# Altium PCB nrf_400708.PcbDoc (part 5 of 6)
Units mm, origin at the board's own origin, x right, y up, seen from the top; angles counter-clockwise.
Board outline 117 x 63.5 mm, 4 copper layers (Top Layer, Mid-Layer 1, Mid-Layer 2, Bottom Layer), stack 1.556 mm thick; 226 components, 168 nets, 912 pads, 2002 vias.
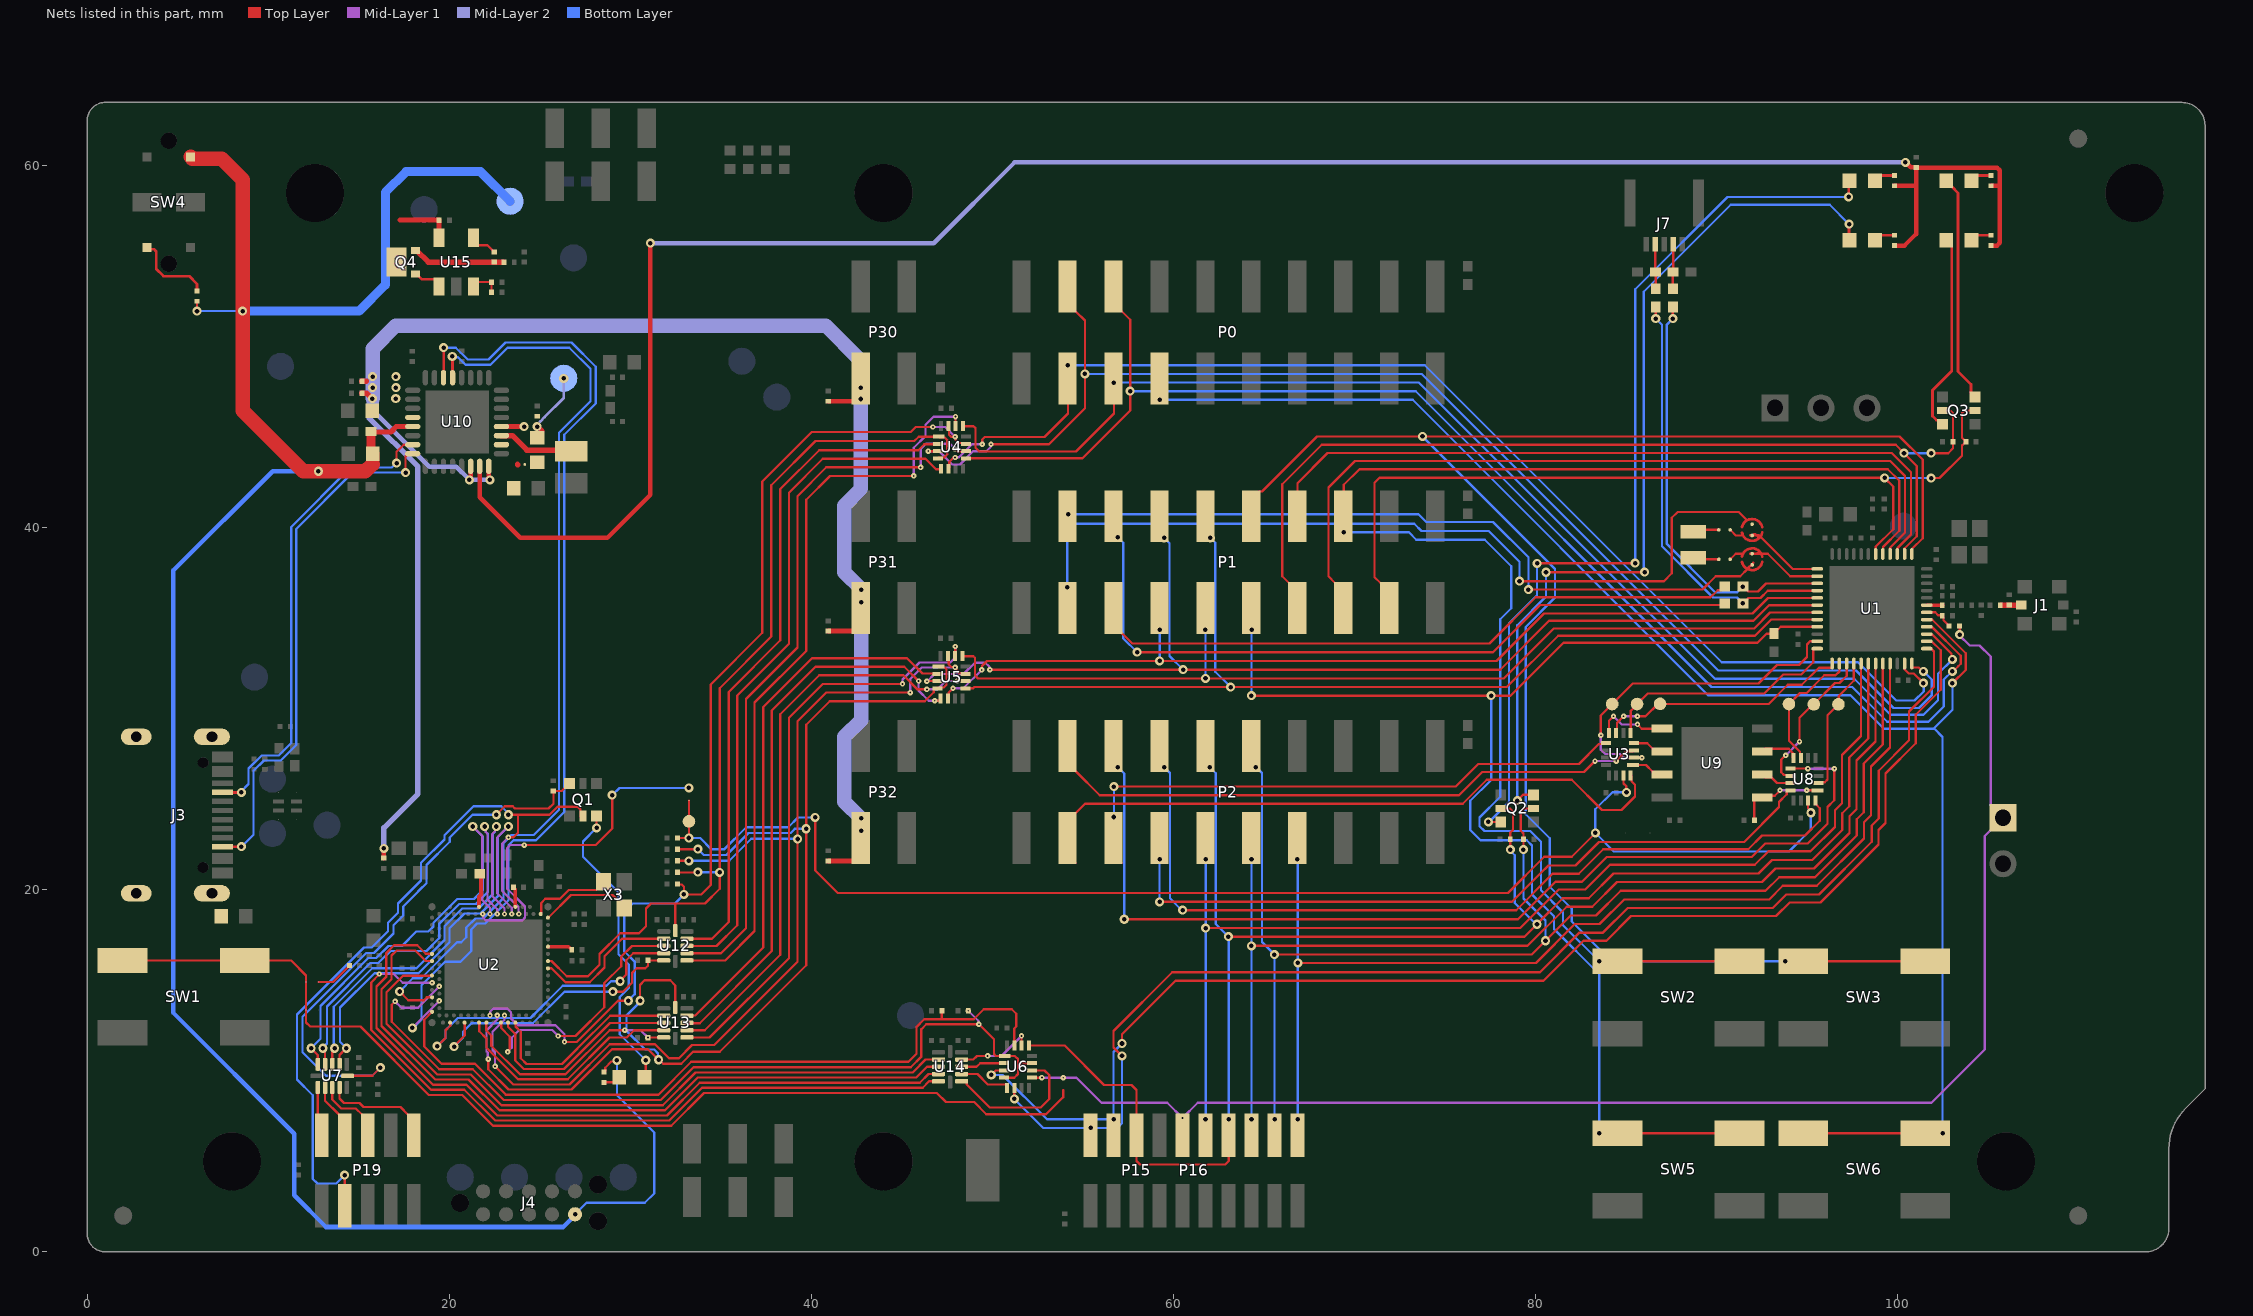
[diagram p5: the nets of this part, all layers, seen from the top]

## Via types
v1: diameter 0.5, hole 0.25, Top Layer to Bottom Layer, tented both sides, 1905 vias
v2: diameter 0.3, hole 0.1, Top Layer to Mid-Layer 1, tented top, 77 vias
v3: diameter 0.3, hole 0.1, Top Layer to Mid-Layer 1, tented both sides, 20 vias

## Nets (pads, with @x,y where several pads share a name; then routed paths per layer and width w, separated by ;. In a path a pad name is that pad's centre, name@x,y a point inside that pad or via, vN(x,y) a via of type N, cw(c..) or ccw(c..) an arc to the next point about the centre after c; other vN are vias at no path point) (continued)
NetC44_1: C44.1 U2.A23 | length 1.1
  Top Layer w0.2: C44.1@23.55,20.154 23.55,20.139 23.66,20.029 U2.A23@23.66,19.064
NetC45_2: C45.2 U2.A13 | length 1.9
  Top Layer w0.225: U2.A13@21.66,19.064 21.66,19.644 21.77,19.754 C45.2@21.77,20.891
NetC59_1: C59.1 J3.SHLD
NetC60_1: C60.1 R3.1 U1.30 | length 1.6
  Top Layer w0.125: U1.30@101.63,35.33 102.102,35.33 102.257,35.175 102.44,35.175 C60.1@102.49,35.125 ; C60.1@102.489,35.117 102.505,35.117 102.561,35.061 102.561,34.99 102.563,34.988 102.563,34.887 R3.1@102.87,34.58
NetC64_2: C64.2 R1.2 R2.2 R19.2 R20.2 U10.31 | length 114.9
  Top Layer w0.25: U10.31@21.692,43.396 21.692,41.686 23.928,39.45 28.749,39.45 31.125,41.826 v1(31.125,55.727) ; R1.2@99.848,55.594 100.403,55.594 101.039,56.23 101.039,58.896 ; R19.2@99.848,58.896 101.039,58.896 ; v1(100.445,60.185) 100.468,60.185 100.743,59.91 101.029,59.91 C64.2@101.039,59.9 ; R2.2@105.182,55.594 105.515,55.594 105.661,55.74 105.661,58.896 ; R20.2@105.182,58.896 105.661,58.896 ; 101.039,58.896 C64.2@101.039,59.9 ; C64.2@101.039,59.9 105.515,59.9 105.661,59.754 105.661,58.896
  Mid-Layer 2 w0.25: v1(31.125,55.727) 46.777,55.727 51.235,60.185 v1(100.445,60.185)
NetC72_1: C72.1 R43.2 U15.3 | length 1.7
  Top Layer w0.125: U15.3@21.35,53.325 21.35,53.338 21.587,53.575 C72.1@22.35,53.575 R43.2@22.35,53.025
NetJ3_A5: J3.A5 U10.23 | length 26.4
  Top Layer w0.125: v1(17.1,43.575) 17.097,43.578 17.097,44.197 17.493,44.593 17.989,44.593 U10.23@17.992,44.596
  Top Layer w0.15: J3.A5@7.485,25.384 v1@8.526,25.384
  Bottom Layer w0.125: v1(8.527,25.383) 8.527,25.451 8.92,25.844 8.92,26.699 9.648,27.428 10.586,27.428 11.275,28.116 11.275,40.046 14.556,43.327 16.839,43.327 17.087,43.575 v1(17.1,43.575)
NetJ3_B5: J3.B5 U10.24 | length 29.1
  Top Layer w0.125: v1(17.594,43.05) 17.591,43.053 17.591,43.935 17.752,44.096 U10.24@17.992,44.096
  Top Layer w0.15: J3.B5@7.485,22.384 v1(8.529,22.384)
  Bottom Layer w0.125: v1(8.529,22.384) 8.538,22.384 9.2,23.046 9.2,26.575 9.775,27.15 10.701,27.15 11.553,28.001 11.553,39.931 14.671,43.05 v1(17.594,43.05)
NetL2_1: L2.1 U1.31 | length 0.9
  Top Layer w0.2: U1.31@101.664,35.73 L2.1@102.521,35.73 ; L2.1@102.521,35.73 L2.1@102.522,35.729
NetL8_2: L8.2 U10.3 | length 4.2
  Top Layer w0.3: U10.3@22.892,45.096 23.492,45.096 24.292,44.296 L8.2@26.749,44.296
NetLD1_1: LD1.1 Q1.6 | length 16.6
  Top Layer w0.125: v1(28.15,23.425) Q1.6@28.15,24.082 ; LD1.1@30.865,9.716 v1(30.865,10.588)
  Top Layer w0.15: LD1.1@30.802,9.652 LD1.1@30.865,9.716
  Bottom Layer w0.125: v1(28.15,23.425) 27.4,22.675 27.4,21.825 29.358,19.867 29.358,16.442 29.925,15.875 29.925,14.575 29.425,14.075 29.425,12.029 v1(30.865,10.588)
NetLD1_2: LD1.2 R5.1 | length 1.4
  Top Layer w0.125: LD1.2@29.12,9.937 LD1.2@29.405,9.652
  Top Layer w0.15: R5.1@28.56,9.367 29.12,9.367 LD1.2@29.405,9.652
NetLD2_1: LD2.1 Q2.6 | length 51.5
  Top Layer w0.125: v1(77.411,23.75) Q2.6@78.1,23.75 ; v1(80.106,38.04) 80.11,38.044 85.519,38.044 v1(85.525,38.05)
  Top Layer w0.15: v1(97.316,58.277) 97.316,59.125 LD2.1@97.371,59.181
  Bottom Layer w0.125: v1(77.411,23.75) 77.45,23.75 78.55,24.85 78.55,34.725 80.106,36.281 v1(80.106,38.04) ; v1(85.525,38.05) 85.525,53.174 90.629,58.278 v1(97.316,58.277)
NetLD2_2: LD2.2 R19.1 | length 1.2
  Top Layer w0.15: LD2.2@98.768,59.181 99.053,59.466 R19.1@99.848,59.466
NetLD3_1: LD3.1 Q3.6 | length 12.6
  Top Layer w0.15: LD3.1@102.705,59.155 103.011,58.849 103.358,58.502 103.358,48.642 104.075,47.925 104.075,47.538 104.076,47.537 104.076,47.449 Q3.6@104.3,47.225
NetLD3_2: LD3.2 R20.1 | length 1.2
  Top Layer w0.15: LD3.2@104.102,59.181 104.387,59.466 R20.1@105.182,59.466
NetLD4_1: LD4.1 Q2.3 | length 49.9
  Top Layer w0.125: v1(79.016,24.934) 79.332,25.25 Q2.3@79.9,25.25 ; v1(80.598,37.544) 86.044,37.544 v1(86.05,37.55)
  Top Layer w0.15: v1(97.341,56.777) 97.341,55.909 LD4.1@97.371,55.879
  Bottom Layer w0.125: v1(79.016,24.934) 79.016,34.618 80.598,36.2 v1(80.598,37.544) ; v1(86.05,37.55) 85.991,37.609 85.991,53.041 90.8,57.85 96.268,57.85 v1(97.341,56.777)
NetLD4_2: LD4.2 R1.1 | length 0.8
  Top Layer w0.15: LD4.2@99.053,56.164 R1.1@99.848,56.164
NetLD5_1: LD5.1 Q3.3 | length 11
  Top Layer w0.15: Q3.3@102.5,45.725 102.275,45.95 102.168,45.95 101.95,46.168 101.95,47.6 103.013,48.663 103.013,55.459 103.011,55.461 103.011,55.573 LD5.1@102.705,55.879
NetLD5_2: LD5.2 R2.1 | length 0.8
  Top Layer w0.15: LD5.2@104.387,56.164 R2.1@105.182,56.164
NetP1_5: P1.5 R33.2 | length 36.7
  Top Layer w0.125: P1.5@56.729,35.877 56.729,34.607 57.734,33.603 77.469,33.603 80.032,36.165 89.69,36.165 90.082,36.557 90.275,36.557 R33.2@90.474,36.755
NetP1_6: P1.6 R34.2 | length 41.6
  Top Layer w0.125: P1.6@56.704,40.64 56.704,39.721 v1(56.95,39.475) ; v1(58.012,33.128) 77.666,33.128 80.268,35.73 90.374,35.73 R34.2@90.474,35.83
  Bottom Layer w0.125: v1(56.95,39.475) 57.25,39.175 57.25,33.89 v1(58.012,33.128)
NetQ1_3: Q1.3 R8.1 U7.12 | length 30.8
  Top Layer w0.125: U7.12@14.4,9.725 15.75,9.725 v1(16.2,10.175) ; v1(22.608,24.15) 23.071,24.613 23.517,24.613 23.641,24.488 25.491,24.488 25.766,24.763 R8.1@25.766,25.449 ; R8.1@25.76,25.455 26.223,25.455 26.477,25.71 Q1.3@26.651,25.71
  Bottom Layer w0.125: v1(16.2,10.175) 15.75,9.725 13.2,9.725 11.9,11.025 11.9,12.983 15.429,16.512 15.848,16.512 16.925,17.589 16.925,18.05 17.462,18.588 17.462,19.081 18.183,19.802 18.371,19.99 18.753,20.372 18.753,21.369 20.043,22.66 20.043,22.893 21.3,24.15 v1(22.608,24.15)
NetQ4_1: Q4.1 U15.1 | length 1.7
  Top Layer w0.15: Q4.1@18.15,54.025 18.2,54.025 18.5,53.725 19.225,53.725 19.45,53.5 U15.1@19.45,53.325
NetQ4_2: Q4.2 R9.1 R38.2 | length 5.1
  Top Layer w0.3: Q4.2@18.15,55.325 18.2,55.325 18.851,54.674 R9.1@23.006,54.674
NetR7_1: R7.1 U2.L31 | length 1.4
  Top Layer w0.187: U2.L31@25.46,16.864 26.597,16.864 26.719,16.743 26.734,16.743 26.775,16.702 R7.1@26.775,16.687
NetR23_1: R23.1 SB8.2 | length 2.1
  Top Layer w0.125: SB8.2@12.8,14.91 13.595,14.91 14.412,15.728 14.412,15.743 14.485,15.815 R23.1@14.5,15.815
NetR35_1: R35.1 SB11.2 TP7.1 U3.15 U8.15 | length 77.3
  Top Layer w0.125: R35.1@32.61,22.864 v1(33.25,22.864) TP7.1@33.25,23.783 SB11.2@33.25,24.933 ; v1(40.225,24) 40.225,21.075 41.478,19.822 78.497,19.822 80.5,21.825 82.025,21.825 83.325,23.125 v1(83.325,23.146) ; U3.15@84.875,26.325 84.875,25.882 85.024,25.733 85.024,25.406 v1(85.044,25.385) ; U8.15@95.075,24.925 95.075,24.506 95.225,24.356 v1(95.225,24.26)
  Bottom Layer w0.125: v1(33.25,22.864) 33.874,22.864 34.502,22.236 35.192,22.236 36.41,23.455 38.737,23.455 39.282,24 v1(40.225,24) ; v1@84.816,25.395 84.27,25.395 83.325,24.45 v1(83.325,23.146) 83.376,23.095 84.346,22.125 94.025,22.125 95.225,23.325 v1(95.225,24.26)
NetR36_1: R36.1 SW4.3 | length 4.5
  Top Layer w0.15: SW4.3@3.321,55.488 3.418,55.392 3.708,55.392 3.825,55.275 3.825,54.3 4.225,53.9 5.646,53.9 6.075,53.471 R36.1@6.075,53.085
NetR38_1: R38.1 U15.4 | length 1.6
  Top Layer w0.125: U15.4@21.35,56.025 21.35,55.825 21.572,55.603 22.126,55.603 R38.1@22.485,55.245
NetSB1_2: SB1.2 SB2.1 SB8.1 SW1.2 | length 59.2
  Top Layer w0.125: SW1.2@1.963,16.097 SW1.2@8.713,16.097 11.277,16.097 12.1,15.273 SB8.1@12.1,14.91 ; 12.1,14.864 SB2.1@12.1,13.364 12.1,12.675 12.325,12.45 15.1,12.45 18.878,8.672 20.728,8.672 22.428,6.972 32.275,6.972 34.086,8.784 46.944,8.784 47.453,8.275 49.011,8.275 49.681,7.605 52.98,7.605 53.925,8.55 SB1.2@53.925,8.925
NetSB3_2: SB3.2 X1.2 | length 1.4
  Top Layer w0.125: X1.2@88.739,39.793 88.833,39.887 SB3.2@90.145,39.887
NetSB4_2: SB4.2 X1.1 | length 1.4
  Top Layer w0.125: X1.1@88.739,38.343 88.82,38.262 SB4.2@90.145,38.262
NetU2_B30: U2.B30 X3.3 | length 4.6
  Top Layer w0.125: U2.B30@25.06,18.664 25.079,18.684 25.079,18.754 25.085,18.76 25.085,19.273 25.315,19.502 26.123,19.502 26.61,19.99 28.127,19.99 28.531,20.394 X3.3@28.531,20.444
NetU2_C31: U2.C31 X3.1 | length 5.1
  Top Layer w0.125: U2.C31@25.46,18.464 25.485,18.464 26.735,19.715 29.027,19.715 29.681,19.061 X3.1@29.681,18.994
NetU4_2: U4.2 U12.10 | length 37.5
  Top Layer w0.125: U12.10@33.14,17.3 34.53,17.3 35.45,18.22 35.45,30.936 38.3,33.786 38.3,42.14 40.45,44.29 45.926,44.29 46.255,44.619 46.984,44.619 U4.2@47.003,44.637
NetU4_5: U4.5 U12.9 | length 37.8
  Top Layer w0.125: U12.9@33.14,16.9 34.775,16.9 35.925,18.05 35.925,30.739 38.775,33.589 38.775,41.944 40.646,43.815 46.322,43.815 46.903,43.233 47.13,43.233 47.16,43.262 U4.5@47.178,43.262
NetU4_10: U4.10 U12.8 | length 40.1
  Top Layer w0.125: U12.8@33.14,16.5 35.016,16.5 36.4,17.884 36.4,30.542 39.25,33.392 39.25,41.747 40.843,43.34 v2@46.05,43.34
  Top Layer w0.127: v2(47.946,44.371) 47.966,44.371 48.1,44.237 U4.10@48.553,44.237
  Mid-Layer 1 w0.125: v2(46.05,43.336) 46.05,44.35 46.341,44.641 47.675,44.641 v2(47.946,44.371)
NetU4_14: U4.14 U12.7 | length 41.4
  Top Layer w0.125: U12.7@33.14,16.1 35.254,16.1 36.875,17.721 36.875,30.346 39.725,33.196 39.725,41.55 41.04,42.865 v2(45.675,42.865) ; U4.14@47.971,45.619 U4.14@47.978,45.612
  Top Layer w0.127: U4.14@47.978,45.612 v2(47.977,46.144)
  Mid-Layer 1 w0.125: v2(45.675,42.865) 45.675,44.425 46.325,45.075 46.325,45.7 46.769,46.144
  Mid-Layer 1 w0.127: 46.769,46.144 v2(47.977,46.144)
NetU5_2: U5.2 U13.10 | length 30.2
  Top Layer w0.125: U13.10@33.14,13.05 33.148,13.058 33.596,13.058 37.35,16.812 37.35,30.101 40.049,32.8 45.3,32.8 46.152,31.948 46.863,31.948 46.875,31.936 U5.2@46.985,31.936
NetU5_5: U5.5 U13.9 | length 31.1
  Top Layer w0.125: U13.9@33.14,12.637 33.847,12.637 37.825,16.616 37.825,29.904 40.246,32.325 45.147,32.325 v2(45.936,31.536) ; v2(46.825,30.45) 47.113,30.45 47.16,30.497 U5.5@47.16,30.561
  Mid-Layer 1 w0.125: v2(45.936,31.536) 45.936,31.014 46.5,30.45 v2(46.825,30.45)
NetU5_10: U5.10 U13.8 | length 31.8
  Top Layer w0.125: U13.8@33.14,12.25 34.131,12.25 38.3,16.419 38.3,29.707 40.443,31.85 45.1,31.85 45.875,31.075 v2(46.4,31.075)
  Top Layer w0.127: v2(48.07,31.536) U5.10@48.535,31.536
  Mid-Layer 1 w0.125: v2(46.4,31.075) 46.975,31.075 47.436,31.536 v2(48.07,31.536)
NetU5_14: U5.14 U13.7 | length 32.6
  Top Layer w0.125: U13.7@33.14,11.84 34.393,11.84 38.775,16.222 38.775,29.51 40.64,31.375 v2(45.05,31.375) ; U5.14@47.953,32.918 U5.14@47.96,32.911
  Top Layer w0.127: U5.14@47.96,32.911 v2@47.96,33.442
  Mid-Layer 1 w0.125: v2(45.05,31.375) 45.05,31.625 45.989,32.564 47.274,32.564 47.275,32.565
  Mid-Layer 1 w0.127: 47.275,32.565 47.69,32.565 47.96,32.835 v2(47.96,33.442)
NetU6_2: U6.2 U14.9 | length 2.4
  Top Layer w0.125: U14.9@48.315,10.225 49.141,10.225 49.341,10.425 U6.2@50.65,10.425
NetU6_5: U6.5 U14.8 | length 2.9
  Top Layer w0.125: U14.8@48.315,9.825 49.189,9.825 49.764,9.25 50.778,9.25 50.825,9.203 U6.5@50.825,9.05
NetU6_10: U6.10 U14.7 | length 8.1
  Top Layer w0.125: U14.7@48.315,9.425 48.536,9.425 48.599,9.363 48.599,9.245 49.864,7.98 51.425,7.98
  Top Layer w0.127: 51.425,7.98 52.682,7.98 53.15,8.448 53.15,9.775 52.9,10.025 U6.10@52.2,10.025
NetU6_14: U6.14 U14.10 | length 4.4
  Top Layer w0.127: U14.10@48.315,10.625 48.961,10.625 49.161,10.825 v2(49.75,10.825) ; U6.14@51.625,11.4 v2@51.625,11.93
  Mid-Layer 1 w0.127: v2(49.75,10.825) 50.518,10.825 v2(51.624,11.931)
NFC1: C17.1 J7.2 R21.2 | length 2.5
  Top Layer w0.125: R21.2@87.604,53.204 C17.1@87.604,54.123 87.629,54.148 J7.2@87.629,55.654
NFC2: C19.2 J7.4 R22.2 | length 2.5
  Top Layer w0.125: J7.4@86.629,55.654 86.629,54.146 C19.2@86.652,54.123 86.661,54.114 R22.2@86.661,53.204
nRF54_RESET: P3.1 P15.10 P16.10 R3.2 SB1.1 U6.9 | length 80.3
  Top Layer w0.125: U6.9@52.2,9.625 U6.9@52.2,9.625 v2(52.752,9.626) ; R3.2@103.435,34.575 103.447,34.563 v1(103.447,34.105)
  Mid-Layer 1 w0.125: v2(52.752,9.626) 53.924,9.626 v2(53.925,9.625) 54.662,9.625 56.047,8.239 59.679,8.239 v2(60.518,7.4) ; v2@60.495,7.377 v2(60.518,7.4) ; v1(103.447,34.105) 103.447,34.053 104,33.5 104.55,33.5 105.16,32.89 105.16,24.668 P3.1@105.845,23.983 104.835,22.972 104.835,11.178 101.896,8.239 61.358,8.239 v2(60.518,7.4)
P0.00: P0.3 U1.23 U4.6 | length 68.2
  Top Layer w0.125: v2(49.45,44.619) 49.45,44.875 49.591,45.016 52.889,45.016 54.189,46.317 54.189,48.235 P0.3@54.164,48.26 v1(54.164,48.975) ; U1.23@100.414,32.496 100.414,32.172 100.633,31.953 100.918,31.953 101.446,31.425 v1(101.45,31.425)
  Top Layer w0.127: U4.6@47.578,43.262 47.624,43.309 47.624,43.624 47.852,43.852 47.92,43.852 v2(47.953,43.885)
  Mid-Layer 1 w0.127: v2(47.953,43.885) 47.964,43.895 48.17,43.895 48.894,44.619 v2(49.45,44.619)
  Bottom Layer w0.125: v1(54.164,48.975) 73.905,48.975 90.305,32.575 97.832,32.575 99.952,30.455 100.956,30.455 101.462,30.961 101.462,31.413 v1(101.45,31.425)
P0.01: P0.4 U1.24 U4.3 | length 75
  Top Layer w0.125: v2(49.939,44.619) 49.941,44.616 53.141,44.616 55.125,46.601 v1(55.125,48.5) 55.125,51.452 54.61,51.967 54.189,52.388 P0.4@54.189,53.222 ; U1.24@100.805,32.505 100.805,32.318 100.84,32.284 101.189,32.284 101.398,32.075 v1(101.45,32.075)
  Top Layer w0.127: v2(46.472,44.237) U4.3@47.003,44.237
  Mid-Layer 1 w0.127: v2(46.472,44.237) 47.063,44.237 47.8,43.5 48.225,43.5 48.95,44.225 49.675,44.225 49.906,44.456 49.906,44.586 v2(49.939,44.619)
  Bottom Layer w0.125: v1(55.125,48.5) 73.736,48.5 90.116,32.12 97.728,32.12 99.8,30.048 101.203,30.048 101.915,30.76 101.915,31.61 101.913,31.612 101.913,31.617 101.454,32.075 v1(101.45,32.075)
P0.02: P0.5 U1.27 U4.13 | length 70.6
  Top Layer w0.125: U4.13@48.378,45.612 48.971,45.612 49.075,45.509 49.075,44.425 49.284,44.216 54.628,44.216 56.729,46.317 P0.5@56.729,48.025 ; P0.5@56.704,48.26 56.725,48.239 v1(56.725,48.025) ; U1.27@101.639,34.121 101.885,34.121 101.913,34.093 101.944,34.093 102.992,33.044 102.992,32.785 v1(103.047,32.73)
  Bottom Layer w0.125: v1(56.725,48.025) 73.568,48.025 89.928,31.665 97.624,31.665 99.622,29.667 101.448,29.667 102.25,30.469 102.25,31.933 v1(103.047,32.73)
P0.03: P0.6 U1.28 U4.9 | length 75.9
  Top Layer w0.125: U4.9@48.553,43.837 54.987,43.837 57.625,46.475 57.625,51.492 56.729,52.388 P0.6@56.729,53.222 ; U1.28@101.63,34.53 101.645,34.516 101.927,34.516 103.51,32.933 103.51,32.491 103.374,32.355 103.094,32.075 v1(103.05,32.075)
  Bottom Layer w0.125: v1(57.625,47.55) 73.399,47.55 89.739,31.21 97.521,31.21 99.444,29.286 101.733,29.286 102.575,30.128 102.575,31.614 103.036,32.075 v1(103.05,32.075)
P0.04: P0.7 SW6.2 U1.29 | length 89.8
  Top Layer w0.125: U1.29@101.639,34.921 101.645,34.916 101.934,34.916 103.785,33.065 103.785,32.15 v1@103.059,31.425
  Top Layer w0.15: v1(59.25,47.075) P0.7@59.25,48.558 ; SW6.2@94.804,6.558 SW6.2@101.554,6.558 v1(102.504,6.558)
  Bottom Layer w0.125: v1(59.25,47.075) 73.231,47.075 89.551,30.755 97.417,30.755 99.266,28.905 102.01,28.905 102.028,28.923 ; v1(102.504,6.558) 102.504,28.447 102.028,28.923 ; v1(103.047,31.425) 103.05,31.422 103.05,29.945 102.028,28.923
P1.00: P1.3 SB5.2 | length 46.3
  Top Layer w0.125: v1(79.134,37.052) v1(79.134,37.052) 87.114,37.053 87.55,37.49 87.55,40.55 87.875,40.875 91.243,40.875 91.703,40.415
  Bottom Layer w0.125: v1(54.15,36.725) 54.15,39.825 54.55,40.225 73.326,40.225 73.726,39.825 77.431,39.825 79.134,38.122 v1(79.134,37.052)
P1.00/XL1: SB3.1 SB5.1 U1.1 | length 5.8
  Top Layer w0.125: SB3.1@90.77,39.887 91.082,39.575 91.483,39.575 ; 91.863,39.591 92.37,39.591 94.231,37.73 U1.1@95.58,37.73 ; SB5.1@91.982,39.575 91.995,39.575 92.059,39.639 92.17,39.639 92.372,39.437
P1.01: P1.4 SB6.2 | length 41.6
  Top Layer w0.125: v1(79.63,36.591) 89.242,36.591 89.981,37.33 91.33,37.33 91.723,37.723 SB6.2@91.911,37.911 ; 91.702,37.735 92.041,38.073 ; 91.735,37.702 91.745,37.713
  Top Layer w0.15: P1.4@54.164,40.64 54.2,40.676 v1(54.2,40.75)
  Bottom Layer w0.125: v1(54.2,40.75) 73.55,40.75 73.975,40.325 77.676,40.325 79.63,38.371 v1(79.63,36.591)
P1.01/XL2: SB4.1 SB6.1 U1.2 | length 5.8
  Top Layer w0.125: SB4.1@90.77,38.262 91.082,38.574 91.483,38.574 ; 91.861,38.57 92.851,38.57 94.091,37.33 U1.2@95.58,37.33 ; SB6.1@91.982,38.574 91.991,38.565 92.027,38.565 92.042,38.549 92.226,38.549 92.38,38.703 ; 92.355,38.728 92.38,38.703 ; 92.381,38.704 92.38,38.703 ; 92.518,38.565 92.413,38.67 92.38,38.703
P1.02/NFC1: R21.1 R33.1 U1.3 | length 23.1
  Top Layer w0.125: v1(87.604,51.554) R21.1@87.604,52.204 ; v1(91.474,36.755) 91.499,36.755 91.774,36.48 92.305,36.48 92.755,36.93 U1.3@95.58,36.93
  Bottom Layer w0.125: v1(87.604,51.554) 87.275,51.225 87.275,39.1 89.937,36.438 91.156,36.438 v1(91.474,36.755)
P1.03/NFC2: R22.1 R34.1 U1.4 | length 23.7
  Top Layer w0.125: v1(86.661,51.554) R22.1@86.661,52.204 ; R34.1@91.384,35.887 91.416,35.887 v1(91.474,35.83) 91.499,35.83 91.711,36.042 91.711,36.052 91.784,36.125 92.441,36.125 92.846,36.53 U1.4@95.58,36.53
  Bottom Layer w0.125: v1(86.661,51.554) 87,51.215 87,38.975 89.82,36.155 91.149,36.155 v1(91.474,35.83)
P1.04: P1.7 U1.5 U5.6 | length 52.3
  Top Layer w0.125: U5.6@47.56,30.561 47.608,30.609 47.608,30.905 v2(47.839,31.136) ; v2(49.425,32.15) 49.439,32.164 49.439,32.364 49.72,32.645 v1(59.257,32.645) 77.866,32.645 80.488,35.267 92.004,35.267 92.858,36.121 U1.5@95.571,36.121
  Mid-Layer 1 w0.125: v2(47.839,31.136) 48.411,31.136 v2(49.425,32.15)
  Bottom Layer w0.125: v1(59.257,32.645) 59.263,32.652 59.263,34.369 v1(59.269,34.375)
P1.05: P1.8 U1.6 U5.3 | length 60.9
  Top Layer w0.125: v2(49.875,32.157) 49.881,32.163 78.066,32.163 80.768,34.865 92.066,34.865 92.922,35.721 U1.6@95.571,35.721 ; P1.8@59.244,40.64 59.244,39.706 v1(59.5,39.45)
  Top Layer w0.127: v2(46.4,31.525) 46.411,31.536 U5.3@46.985,31.536
  Mid-Layer 1 w0.127: v2(46.4,31.525) 46.411,31.525 46.811,31.925 48.425,31.925 49.05,32.55 49.625,32.55 49.842,32.333 49.842,32.19 v2(49.875,32.157)
  Bottom Layer w0.125: v1(59.5,39.45) 59.8,39.15 59.8,32.915 v1(60.552,32.163)
P1.06: P1.9 U1.7 U5.13 | length 53.7
  Top Layer w0.125: U5.13@48.36,32.911 48.954,32.911 49.05,32.815 49.05,31.85 49.22,31.68 v1(61.787,31.68) 78.266,31.68 81.029,34.444 92.096,34.444 92.973,35.321 U1.7@95.571,35.321 ; v1(61.784,34.375) P1.9@61.784,35.56
  Bottom Layer w0.125: v1(61.784,34.375) 61.786,34.374 v1(61.787,31.68) v1(61.787,31.68)
P1.07: P1.10 U1.8 U5.9 | length 58.6
  Top Layer w0.125: U5.9@48.535,31.136 48.961,31.136 49.024,31.2 v1(63.175,31.2) 78.43,31.2 81.274,34.044 92.149,34.044 93.035,34.93 U1.8@95.58,34.93 ; P1.10@61.784,40.64 61.784,39.716 v1(62.05,39.45)
  Bottom Layer w0.125: v1(62.05,39.45) 62.325,39.175 62.325,32.05 v1(63.175,31.2)
P1.08: C41.2 P1.11 SW5.2 U1.9 | length 73.3
  Top Layer w0.125: v1(64.325,30.725) 78.637,30.725 81.558,33.646 92.279,33.646 92.788,34.155 C41.2@93.186,34.155 93.561,34.53 U1.9@95.58,34.53
  Top Layer w0.15: v1(83.535,6.558) SW5.2@84.543,6.558 SW5.2@91.293,6.558
  Bottom Layer w0.125: v1(64.325,30.725) 64.334,30.734 64.334,34.366 v1(64.342,34.375) ; v1(77.567,30.725) 77.567,26.075 76.417,24.925 76.417,23.308 76.983,22.742 79.529,22.742 79.825,22.446 79.825,19.75 81.033,18.542 81.033,17.84 83.535,15.339 v1(83.535,6.558)
P1.09: P1.12 SW3.2 U1.37 | length 97.8
  Top Layer w0.125: P1.12@64.349,40.322 64.349,41.591 64.77,42.011 64.911,42.011 67.95,45.05 100.125,45.05 101.405,43.77 101.405,39.43 100.814,38.839 100.814,38.564 U1.37@100.805,38.555
  Top Layer w0.152: v1(93.804,16.058) SW3.2@94.804,16.058 SW3.2@101.554,16.058
  Bottom Layer w0.125: v1(73.775,45.05) 81.1,37.725 81.1,36.15 79.475,34.525 79.475,25.128 79.478,25.125 79.478,24.742 79.475,24.739 79.475,24.175 80.8,22.85 80.8,20.176 82.024,18.952 82.024,18.251 84.217,16.058 v1(93.804,16.058)
P1.10: P1.13 Q3.2 R11.1 U1.38 | length 53.5
  Top Layer w0.125: P1.13@66.889,36.195 66.419,36.666 66.419,36.933 66.032,37.319 66.032,42.403 68.214,44.585 99.915,44.585 v1(100.375,44.125) 101.08,43.42 101.08,39.531 100.415,38.866 100.415,38.565 U1.38@100.405,38.555 ; v1(101.875,44.125) 102.813,44.125 103.081,44.393 R11.1@103.081,44.763 103.081,46.319 102.939,46.461 102.514,46.461 Q3.2@102.5,46.475
  Bottom Layer w0.125: v1(100.375,44.125) v1(101.875,44.125)
P1.11: P1.14 U1.39 | length 43.3
  Top Layer w0.125: P1.14@66.526,41.956 P1.14@66.864,41.956 ; P1.14@66.864,40.64 P1.14@66.864,41.605 ; P1.14@66.889,40.322 66.889,41.592 66.902,41.605 P1.14@66.902,41.943 ; P1.14@66.889,41.956 P1.14@66.864,41.956 ; U1.39@100.014,38.564 100.014,38.891 100.755,39.632 100.755,43.07 99.695,44.13 68.53,44.13 66.864,42.464 P1.14@66.864,41.956
P1.12: P1.15 U1.40 | length 43.8
  Top Layer w0.125: P1.15@69.429,36.195 68.959,36.666 68.959,36.941 68.582,37.318 68.582,42.223 70.044,43.685 99.614,43.685 100.43,42.869 100.43,39.733 99.615,38.918 U1.40@99.615,38.565
P1.13: P1.16 SW2.2 U1.41 | length 82.6
  Top Layer w0.125: P1.16@69.429,40.64 69.429,42.379 70.289,43.239 99.482,43.239 100.105,42.616 100.105,39.832 99.215,38.942 U1.41@99.215,38.565
  Top Layer w0.15: v1(69.425,39.75) P1.16@69.425,40.318 ; v1(83.535,16.058) SW2.2@84.543,16.058 SW2.2@91.293,16.058
  Bottom Layer w0.125: v1(69.425,39.75) 73.029,39.75 73.436,39.343 77.216,39.343 78.675,37.884 78.675,37.247 78.671,37.243 78.671,35.958 78.675,35.955 78.675,35.55 78.075,34.95 78.075,25.148 76.925,23.998 76.925,23.519 77.194,23.25 79.725,23.25 80.317,22.658 80.317,19.976 81.541,18.752 81.541,18.051 v1(83.535,16.058)
P1.14: P1.17 Q3.5 R27.1 U1.42 | length 48.2
  Top Layer w0.125: P1.17@71.969,35.877 71.969,36.462 71.499,36.933 71.467,36.933 71.125,37.275 71.125,42.49 71.395,42.759 v1@99.294,42.759 ; U1.42@98.815,38.565 98.815,38.966 99.775,39.926 99.775,42.278 v1(99.298,42.755) ; v1(101.875,42.75) 102.34,42.75 103.575,43.985 103.575,44.548 103.703,44.675 103.718,44.675 103.79,44.748 103.79,44.778 103.73,44.838 103.715,44.838 103.575,44.978 103.575,46.339 103.711,46.475 Q3.5@104.3,46.475
  Bottom Layer w0.125: v1(99.298,42.755) 99.303,42.75 v1(101.875,42.75)
P2.00: TP19.1 U1.11 U3.2 | length 18.9
  Top Layer w0.125: v2(83.628,28.54) 83.625,28.543 83.625,29.637 TP19.1@84.253,30.265 85.388,31.4 92.337,31.4 93.362,32.425 94.575,32.425 95.017,32.867 95.017,33.561 95.187,33.73 U1.11@95.58,33.73 ; U3.2@85.45,27.3 v2(85.898,27.3)
  Mid-Layer 1 w0.125: v2(83.628,28.54) 83.628,27.745 83.873,27.5 84.679,27.5 84.879,27.3 v2(85.898,27.3)
P2.00_A: P2.3 U3.16 | length 37
  Top Layer w0.125: P2.3@54.61,21.487 54.19,21.907 54.189,23.812 55.127,24.75 76,24.75 77.326,26.076 82.024,26.076 83.685,24.415 ; 83.697,24.413 84.764,24.413 85.511,25.16 85.511,25.807 85.322,25.996 85.322,26.278 U3.16@85.275,26.325
P2.00_B: U3.1 U9.7 | length 1.8
  Top Layer w0.125: U3.1@85.428,26.9 86.12,26.9 86.493,26.528 86.585,26.435 86.935,26.435 U9.7@87.005,26.365
P2.01: TP20.1 U1.12 U3.5 | length 13.4
  Top Layer w0.125: U3.5@85.275,28.675 85.275,29.887 TP20.1@85.628,30.24 ; TP20.1@85.628,30.265 86.213,30.85 92.649,30.85 93.699,31.9 94.695,31.9 95.364,32.569 95.364,33.295 95.398,33.33 U1.12@95.58,33.33
P2.01_A: P2.4 U3.3 | length 34
  Top Layer w0.125: P2.4@54.164,27.94 54.164,27.013 54.61,26.567 55.952,25.226 75.791,25.226 77.079,26.513 82.701,26.513 v2(83.303,27.115) ; v2(84.478,27.115) 85.015,27.653 85.403,27.653 U3.3@85.45,27.7
  Mid-Layer 1 w0.125: v2(83.303,27.115) v2(84.478,27.115)
P2.01_B: U3.4 U9.6 | length 1.7
  Top Layer w0.125: U3.4@85.45,28.1 86.19,28.1 86.493,27.798 86.655,27.635 U9.6@87.005,27.635
P2.02: TP21.1 U1.13 U3.7 | length 13.9
  Top Layer w0.125: U3.7@84.475,28.675 84.515,28.715 84.515,29.223 v2(84.882,29.59) ; v2(85.65,29.59) 86.098,29.59 86.779,30.272 92.897,30.272 93.95,31.325 94.732,31.325 95.682,32.275 96.371,32.275 96.405,32.31 U1.13@96.405,32.505
  Mid-Layer 1 w0.125: v2(84.882,29.59) v2(85.65,29.59)
P2.02_A: P2.5 U3.9 | length 31.5
  Top Layer w0.125: P2.5@56.729,22.956 56.729,21.908 P2.5@57.15,21.487 ; v1(56.729,25.705) 75.605,25.705 76.851,26.951 82.414,26.951 83.515,28.053 83.853,28.053 U3.9@83.9,28.1
  Bottom Layer w0.125: v1(56.729,24.025) v1(56.729,25.705)
P2.02_B: U3.8 U9.5 | length 4
  Top Layer w0.125: U3.8@84.075,28.675 U3.8@84.075,28.675 84.077,29.339 v2(84.328,29.59) ; v2(85.653,29.14) 85.888,28.905 U9.5@87.005,28.905
  Mid-Layer 1 w0.125: v2(84.328,29.59) 84.778,29.14 v2(85.653,29.14)
P2.03: TP23.1 U1.14 U8.7 | length 7.3
  Top Layer w0.125: TP23.1@93.978,30.227 94.626,30.875 94.998,30.875 95.973,31.85 96.59,31.85 96.805,32.066 U1.14@96.805,32.505 ; TP23.1@94.016,30.265 94.016,28.234 94.628,27.622 94.628,27.33 U8.7@94.683,27.275
P2.03_A: P2.6 U8.9 | length 56.8
  Top Layer w0.125: P2.6@56.704,27.94 56.95,27.694 v1(56.95,26.775) ; v1(57.3,18.375) 79.045,18.375 81.12,20.449 82.586,20.449 83.948,21.812 91.957,21.812 92.707,22.562 95.062,22.562 96.15,23.65 96.15,24.577 96.528,24.955 v2(96.528,26.69) ; U8.9@94.1,26.7 v2(95.064,26.7)
  Top Layer w0.15: P2.6@56.729,26.996 v1(56.95,26.775)
  Mid-Layer 1 w0.125: v2(95.064,26.7) 95.074,26.69 v2(96.528,26.69)
  Bottom Layer w0.125: v1(56.95,26.775) 57.3,26.425 v1(57.3,18.375)
P2.03_B: U8.8 U9.3 | length 2.1
  Top Layer w0.125: U9.3@92.545,27.635 92.7,27.79 94.004,27.79 94.228,27.566 94.228,27.323 U8.8@94.275,27.275
P2.04: TP24.1 U1.15 U8.10 | length 8.3
  Top Layer w0.125: v2(93.837,27.425) 93.81,27.425 93.587,27.203 93.587,26.493 93.74,26.34 94.06,26.34 U8.10@94.1,26.3 ; v2(94.603,28.19) 94.603,29.502 95.351,30.25 TP24.1@95.391,30.25 96.566,31.425 96.805,31.425 97.205,31.825 U1.15@97.205,32.505
  Mid-Layer 1 w0.125: v2(93.837,27.425) v2@94.602,28.19
P2.04_A: P2.7 U8.12 | length 41.2
  Top Layer w0.125: P2.7@59.244,22.86 59.248,22.856 v1(59.248,21.7) ; v1(59.248,19.339) 78.723,19.339 80.271,20.887 80.734,21.35 82.226,21.35 83.526,22.65 91.55,22.65 93.475,24.575 93.475,24.853 93.9,25.277 93.9,25.453 93.947,25.5 U8.12@94.1,25.5
  Bottom Layer w0.125: v1(59.248,19.339) v1(59.248,21.7)
P2.04_B: U8.11 U9.2 | length 1.7
  Top Layer w0.125: U9.2@92.545,26.365 92.707,26.203 93.057,26.203 93.36,25.9 U8.11@94.1,25.9
P2.05: TP25.1 U1.16 U8.2 | length 7.6
  Top Layer w0.125: U8.2@95.65,25.9 95.697,25.947 95.997,25.947 96.15,26.1 96.15,29.65 96.766,30.266 96.766,30.714 97.605,31.554 U1.16@97.605,32.505
P2.05_A: P2.8 U8.16 | length 48.1
  Top Layer w0.125: P2.8@59.244,27.94 59.244,27.031 v1(59.5,26.775) ; v1(60.525,18.875) 78.95,18.875 80.962,20.887 82.404,20.887 83.767,22.25 91.776,22.25 92.526,23 94.905,23 95.725,23.82 95.725,24.514 95.527,24.713 95.522,24.713 95.475,24.76 U8.16@95.475,24.925
  Bottom Layer w0.125: v1(59.5,26.775) 59.819,26.456 59.819,19.531 60.475,18.875 v1(60.525,18.875)
P2.05_B: R39.1 U8.1 U9.1 | length 4.8
  Top Layer w0.125: R39.1@92.107,23.835 92.107,24.933 92.269,25.095 U9.1@92.545,25.095 92.647,25.197 93.234,25.197 v2@93.531,25.494 ; v2(95,25.5) U8.1@95.6,25.5
  Mid-Layer 1 w0.125: v2(93.525,25.5) v2(95,25.5)
P2.06: P2.9 P16.12 U1.17 | length 63.1
  Top Layer w0.125: v1(61.787,7.32) 61.787,6.465 61.788,6.464 P16.12@61.788,6.45 ; v1(61.795,17.887) 79.17,17.887 81.3,20.018 82.764,20.018 84.127,21.38 92.136,21.38 92.886,22.13 95.215,22.13 96.564,23.479 96.564,24.394 96.95,24.78 96.95,27.45 98.005,28.505 U1.17@98.005,32.505 ; v1(61.795,21.7) P2.9@61.795,22.849
  Bottom Layer w0.125: v1(61.787,7.32) 61.795,7.329 61.795,17.894 v1(61.795,21.7)
P2.07: P2.10 P15.6 P16.6 P16.14 Q2.5 R12.1 U1.18 U6.13 | length 93.4
  Top Layer w0.125: U6.13@52.025,11.4 54.01,11.4 56.185,9.225 57.7,9.225 57.978,8.947 P16.6@57.978,6.45 57.978,5.018 58.17,4.826 62.877,4.826 63.07,5.019 63.07,6.439 P16.14@63.058,6.45 63.058,7.309 v1(63.07,7.32) ; P2.10@61.784,27.94 61.784,27.016 v1(62.025,26.775) ; v1(63.051,17.411) 79.411,17.411 v1(80.1,18.1) 80.1,18.117 81.526,19.543 82.961,19.543 84.324,20.906 92.333,20.906 93.083,21.656 95.311,21.656 96.967,23.312 96.967,24.227 97.353,24.613 97.353,27.308 98.405,28.36 U1.18@98.405,32.505 ; Q2.5@78.1,24.5 78.122,24.478 78.629,24.478 78.769,24.339 78.769,23.309 78.627,23.168 78.627,22.792 v1(78.627,22.226)
  Bottom Layer w0.125: v1(62.025,26.775) 62.354,26.446 62.354,18.108 v1(63.051,17.411) ; v1@63.058,17.411 63.065,17.404 63.065,7.325 v1(63.07,7.32) ; v1(78.627,22.226) 78.627,22.162 78.875,21.915 78.875,19.275 80.05,18.1 v1(80.1,18.1)
P2.08: P2.11 P16.16 U1.19 | length 62
  Top Layer w0.125: v1(64.321,16.908) 79.58,16.908 81.739,19.067 83.158,19.067 84.521,20.429 92.53,20.429 93.28,21.179 95.4,21.179 97.367,23.146 97.367,24.061 97.753,24.448 97.753,27.142 98.805,28.194 U1.19@98.805,32.505 ; P16.16@64.328,6.45 v1(64.328,7.32) ; v1(64.328,21.7) P2.11@64.328,22.856
  Bottom Layer w0.125: v1(64.328,7.32) 64.328,16.908 64.325,16.912 64.325,21.696 v1(64.328,21.7)
P2.09: P2.12 P16.18 Q2.2 R10.1 U1.20 | length 75.5
  Top Layer w0.125: P2.12@64.324,27.94 64.324,27.035 v1(64.575,26.785) ; v1(65.596,16.427) 79.81,16.427 v1(80.57,17.187) 81.968,18.586 83.358,18.586 84.72,19.948 92.729,19.948 93.479,20.698 95.462,20.698 97.767,23.003 97.767,23.896 98.153,24.282 98.153,26.976 99.205,28.029 U1.20@99.205,32.505 ; P16.18@65.598,6.45 65.601,6.453 v1(65.601,7.32) ; v1(79.35,22.226) 79.355,22.23 R10.1@79.355,22.798 79.355,23.109 79.204,23.259 79.204,24.322 79.382,24.5 Q2.2@79.9,24.5
  Bottom Layer w0.125: v1(64.575,26.785) 64.908,26.451 64.908,17.115 v1(65.596,16.427) ; v1@65.598,16.427 65.601,16.424 v1(65.601,7.32) ; v1(79.35,22.226) 79.35,19.525 80.57,18.305 v1(80.57,17.187)
P2.10: P2.13 P16.20 U1.21 | length 60.8
  Top Layer w0.125: P16.20@66.868,6.45 66.875,6.457 66.875,7.309 v1(66.886,7.32) ; v1(66.868,21.7) P2.13@66.868,22.856 ; v1(66.886,15.963) 80.046,15.963 82.191,18.108 83.555,18.108 84.918,19.471 92.927,19.471 93.677,20.221 95.551,20.221 98.167,22.837 98.167,23.73 98.553,24.116 98.553,26.811 99.605,27.863 U1.21@99.605,32.505
  Bottom Layer w0.125: v1(66.868,21.7) 66.877,21.691 66.877,15.958 66.886,15.949 v1(66.886,7.32)
P5V0: C24.2 C26.2 C52.2 C55.2 C56.2 C62.2 C69.1 C70.2 P30.1 P31.1 P32.1 Q4.3 R4.2 R40.2 TP10.1 U10.4 U10.20 U10.30 U10.32 U15.5 | length 113.3
  Top Layer w0.25: R40.2@16.394,21.754 v1(16.394,22.288) ; v1(21.125,42.65) 21.125,42.718 21.184,42.777 21.184,43.388 U10.30@21.192,43.396 ; U10.32@22.192,43.396 22.195,43.393 22.195,42.772 22.25,42.718 v1(22.25,42.65) ; v1(24.867,45.596) 24.907,45.596 25.138,45.365
  Top Layer w0.27: 17.273,57 C69.1@19.45,57 U15.5@19.45,56.025 ; C52.2@40.95,21.59 42.361,21.59 42.759,21.988 v1(42.759,23.254) ; C55.2@40.95,34.29 42.361,34.29 42.734,34.663 P31.1@42.734,35.56 ; C62.2@40.95,46.99 42.75,46.99 v1(42.75,47.116) v1(42.75,47.75)
  Top Layer w0.3: C70.2@15.185,47.425 15.467,47.425 15.755,47.137 v1(15.757,47.137) ; R4.2@15.185,48.091 15.43,48.091 ; U10.4@22.892,45.596 v1@24.038,45.596
  Mid-Layer 2 w0.15: 25.025,45.875 25.04,45.875 25.278,46.113 26.334,47.169 v1(26.334,48.26)
  Mid-Layer 2 w0.25: v1(15.757,47.137) 15.763,47.137 16,46.9 16,46.275 18.9,43.375 20.4,43.375 v1(21.125,42.65) v1(22.25,42.65)
  Mid-Layer 2 w0.3: v1(15.757,47.137) 15.757,47.083 15.6,46.926 15.6,46.05 18.275,43.375 18.275,25.306 16.394,23.425 v1(16.394,22.288)
  Mid-Layer 2 w0.8: v1@15.775,47.155 v1(15.775,47.746) v1(15.775,48.355) 15.775,49.9 17.05,51.175 40.807,51.175 42.75,49.232 v1(42.75,47.75) v1(42.75,47.116) 42.75,42.146 41.829,41.225 41.829,37.55 42.759,36.62 v1(42.759,36.569) v1(42.759,35.877) 42.759,29.38 41.829,28.45 41.829,24.875 v1(42.759,23.945) v1(42.759,23.254)
  other v1: 24.142,45.596 17.055,47.137 17.056,47.746 17.056,48.355
PVSS1: C24.1 C27.1 NT2.2 U10.2 | length 0
  Top Layer w0.3: 23.78,43.496 23.78,43.508 23.792,43.496
QSPI_CTRL: SB11.1 U2.B14 | length 19.4
  Top Layer w0.125: v2(24.15,22.475) 28.1,22.475 29.013,23.388 v1(29.013,25.234)
  Mid-Layer 1 w0.125: v2(21.86,18.664) 21.887,18.638 21.887,18.463 22.025,18.325 24.05,18.325 24.2,18.475 24.2,19.075 23.217,20.058 23.217,22.317 23.375,22.475 v2(24.15,22.475)
  Bottom Layer w0.125: v1(29.013,25.234) 29.412,25.633 v1(33.25,25.633)
RF: C61.2 J1.1 L4.2 | length 1.1
  Top Layer w0.3: L4.2@105.741,35.73 C61.2@106.2,35.73 J1.1@106.845,35.73
SWD0_CLK: U2.B18 U7.4 | length 24.1
  Top Layer w0.125: v1(13.025,11.25) 13.025,11.149 13.15,11.024 U7.4@13.15,10.365
  Mid-Layer 1 w0.125: v1(21.958,23.5) 22.019,23.439 22.019,23.192 22.116,23.095 22.116,19.472 22.66,18.928 v2(22.66,18.664)
  Bottom Layer w0.125: v1(13.025,11.25) 13.025,11.286 13.25,11.511 13.25,13.553 15.652,15.955 16.091,15.955 16.761,16.625 18.75,16.625 19.45,17.325 19.45,18.114 20.561,19.225 21.487,19.225 22.153,19.891 22.153,23.089 22.03,23.212 22.03,23.428 v1(21.958,23.5)
SWD0_CLK_EXT: P19.4 U7.8 | length 3.1
  Top Layer w0.125: U7.8@13.15,9.085 13.15,8.354 13.917,7.588 13.917,6.768 P19.4@14.234,6.45
SWD0_IO: U2.B16 U7.5 | length 24.3
  Top Layer w0.125: v1(12.375,11.25) 12.375,11.246 12.75,10.871 U7.5@12.75,10.365
  Mid-Layer 1 w0.125: v1(21.308,23.5) 21.308,23.496 21.833,22.971 21.833,19.438 22.26,19.01 v2(22.26,18.664)
  Bottom Layer w0.125: v1(12.375,11.25) 12.375,11.254 12.893,11.772 12.893,13.585 15.538,16.23 15.977,16.23 16.647,16.9 17.397,16.9 18.19,17.694 18.849,17.694 19.137,17.982 19.137,18.19 20.447,19.5 21.373,19.5 21.878,20.005 21.878,22.93 21.771,23.038 21.767,23.038 21.308,23.496 v1(21.308,23.5)
SWD0_IO_EXT: P19.2 U7.7 | length 2.7
  Top Layer w0.125: U7.7@12.75,9.085 12.75,6.664 P19.2@12.964,6.45 P19.2@12.975,6.461
SWD0_RESET: U2.B22 U7.2 | length 24.7
  Top Layer w0.125: U7.2@13.95,10.365 13.95,10.871 14.325,11.246 v1(14.325,11.25)
  Mid-Layer 1 w0.125: v1(23.275,23.5) 22.666,22.891 22.666,19.811 23.46,19.017 v2(23.46,18.664)
  Bottom Layer w0.125: v1(14.325,11.25) 14.325,11.254 13.975,11.604 13.975,13.5 15.875,15.4 18.314,15.4 20.025,17.111 20.025,17.875 20.849,18.699 21.738,18.699 22.703,19.663 22.703,22.928 v1(23.275,23.5)
SWD0_RESET_EXT: P19.10 U7.10 | length 6
  Top Layer w0.125: 13.95,8.475 14.2,8.225 15.05,8.225 15.275,8 17.314,8 17.737,7.578 17.737,6.758 P19.10@18.044,6.45 ; 13.95,8.5 U7.10@13.95,9.085
SWD0_SEL: P19.3 Q1.5 U2.B24 | length 42.2
  Top Layer w0.125: v2(23.275,22.9) 23.554,22.9 23.804,23.15 23.804,24.15 ; v1(23.275,24.15) 23.804,24.15 ; Q1.5@27.263,24.047 27.263,24.433 27.101,24.596 25.987,24.596 25.542,24.15 23.804,24.15
  Top Layer w0.15: P19.3@14.234,2.55 v1(14.234,4.246)
  Mid-Layer 1 w0.125: v2(23.275,22.9) 22.941,22.566 22.941,19.943 23.835,19.049 23.835,18.689 v2(23.86,18.664)
  Bottom Layer w0.125: v1(14.234,4.246) 13.763,3.775 12.725,3.775 12.475,4.025 12.475,8.65 11.6,9.525 11.6,13.113 15.303,16.816 15.722,16.816 16.621,17.715 16.621,18.176 17.175,18.73 17.175,19.24 18.455,20.519 18.455,21.496 19.743,22.784 19.743,23.018 21.35,24.625 22.882,24.625 23.275,24.232 v1(23.275,24.15)
SWD0_SWO: U2.B20 U7.3 | length 24.1
  Top Layer w0.125: U7.3@13.55,10.365 13.55,11.024 13.675,11.149 v1(13.675,11.25)
  Mid-Layer 1 w0.125: v1(22.608,23.5) 22.536,23.428 22.536,23.236 22.391,23.091 22.391,19.655 23.06,18.986 v2(23.06,18.664)
  Bottom Layer w0.125: v1(13.675,11.25) 13.625,11.3 13.625,13.539 15.761,15.675 18.2,15.675 19.75,17.225 19.75,17.989 20.735,18.974 21.625,18.974 22.428,19.777 22.428,23.105 22.536,23.214 22.536,23.428 v1(22.608,23.5)
SWD0_SWO_EXT: P19.6 U7.9 | length 3.9
  Top Layer w0.125: U7.9@13.55,9.085 13.55,8.425 14.05,7.925 14.849,7.925 15.2,7.574 15.2,6.754 P19.6@15.504,6.45
SWD3_CLK: U2.R1 U14.3 | length 40.4
  Top Layer w0.125: U2.R1@19.06,16.064 18.715,16.064 18.124,16.655 17.105,16.655 16.825,16.375 16.825,15.065 16.266,14.507 16.266,12.484 19.229,9.521 21.079,9.521 22.779,7.821 31.923,7.821 33.735,9.632 45.811,9.632 46.403,10.225 U14.3@47.035,10.225
SWD3_CTRL: R31.2 U2.AB2 U6.1 U6.4 U6.11 | length 48.1
  Top Layer w0.125: v2(17.02,13.84) 16.831,13.651 16.831,12.719 19.464,10.086 21.314,10.086 23.014,8.386 31.689,8.386 33.5,10.198 44.319,10.198 45.497,10.198 46.091,10.792 46.091,12.065
  Top Layer w0.127: 46.091,11.97 46.091,12.065 46.091,12.306 46.363,12.577 v2(49.267,12.577) 50.1,11.744 50.1,10.925 50.2,10.825 U6.1@50.7,10.825 51.25,10.825 51.425,10.65 51.425,10.425 ; U6.4@50.65,9.625 U6.4@50.65,9.625 51.225,9.625 51.425,9.825 51.425,10.425 ; U6.11@52.2,10.425 51.425,10.425
  Mid-Layer 1 w0.125: v2(48.68,13.325) 49.234,12.771 49.234,12.611 v2(49.267,12.577)
  Mid-Layer 1 w0.127: v2(17.02,13.84) 17.366,13.493 18.289,13.493 v3(19.46,14.664)
SWD3_IO: U2.N1 U14.4 | length 41.3
  Top Layer w0.125: U2.N1@19.06,16.464 18.711,16.464 18.238,16.937 16.961,16.937 16.537,16.514 16.537,15.213 15.987,14.663 15.987,12.363 19.112,9.238 20.962,9.238 22.662,7.538 32.04,7.538 33.852,9.349 46.003,9.349 46.478,9.825 U14.4@47.035,9.825
SWD3_RESET: U2.AA1 U14.5 | length 40.7
  Top Layer w0.125: v2(16.145,15.352) 16.145,15.337 15.696,14.888 15.696,12.254 18.995,8.955 20.845,8.955 22.545,7.255 32.158,7.255 33.969,9.066 46.16,9.066 46.519,9.425 U14.5@47.035,9.425
  Mid-Layer 1 w0.125: v2(16.145,15.352) 16.948,15.352 17.436,14.864 v2(19.06,14.864)
SWD3_SWO: U2.W1 U14.2 | length 38
  Top Layer w0.125: U2.W1@19.06,15.264 19.056,15.26 17.46,15.26 16.544,14.344 16.544,12.606 19.346,9.804 21.196,9.804 22.896,8.104 31.806,8.104 33.617,9.915 45.609,9.915 46.319,10.625 U14.2@47.035,10.625
SWDCLK: P15.4 P16.4 U1.26 U6.3 | length 73.6
  Top Layer w0.125: v1(49.95,9.775) v1(49.95,9.775) 50.201,10.025 U6.3@50.65,10.025 ; P16.4@56.708,6.45 v1(56.708,7.325) ; v1(57.175,11.513) 57.175,12.025 60.128,14.978 80.453,14.978 82.662,17.187 83.937,17.187 85.299,18.55 93.308,18.55 94.058,19.3 95.764,19.3 98.969,22.505 98.969,23.304 99.355,23.69 99.355,26.43 101.025,28.1 101.025,29.675 102.4,31.05 102.4,33.23 101.938,33.693 101.913,33.693 101.885,33.72 U1.26@101.64,33.72
  Bottom Layer w0.125: v1(49.95,9.775) 50.575,9.775 53.025,7.325 v1(56.708,7.325) 56.708,11.046 v1(57.175,11.513)
SWDIO: P15.2 P16.2 U1.25 U6.6 | length 71.2
  Top Layer w0.125: v1(51.225,8.448) U6.6@51.225,9.05 ; v1(57.175,10.825) 56.71,11.29 56.71,12.206 59.957,15.453 62.906,15.453 80.261,15.453 82.445,17.637 83.75,17.637 85.113,19 93.122,19 93.872,19.75 95.676,19.75 98.589,22.662 98.589,23.555 98.975,23.942 98.975,26.586 100.65,28.261 100.65,29.848 102.028,31.226 102.028,33.169 101.867,33.33 U1.25@101.63,33.33
  Bottom Layer w0.125: v1(51.225,8.448) 52.823,6.85 v1(55.438,6.85) 56.925,6.85 57.175,7.1 v1(57.175,10.825)
SWO_CTRL: R17.1 U2.AJ1 U6.15 | length 41.1
  Top Layer w0.125: U2.AJ1@19.06,13.264 18.627,12.831 18.627,11.348 19.588,10.387 21.438,10.387 23.138,8.687 31.564,8.687 33.376,10.498 45.373,10.498 45.815,10.94 45.815,12.42 46.249,12.853 47.231,12.853 ; R17.1@47.224,13.325 47.224,12.86 47.231,12.853 ; U6.15@51.225,11.4 51.225,12.344 51.335,12.454 51.335,13.15 51.085,13.4 49.538,13.4 48.991,12.853 47.231,12.853
TWI0_SCL: U2.AF2 U10.14 | length 55.6
  Top Layer w0.15: U10.14@19.692,48.296 19.699,48.303 v1@19.699,49.949
  Mid-Layer 1 w0.125: v1@17.975,12.376 v3@19.454,13.855
  Bottom Layer w0.125: v1(17.975,12.375) 18.025,12.375 18.475,12.825 18.475,14.725 19.775,16.025 20.625,16.025 21.225,16.625 21.225,17.812 21.548,18.135 21.993,18.135 23.288,19.431 23.288,22.461 23.564,22.737 24.799,22.737 26.366,24.304 26.366,45.137 28.1,46.871 28.1,48.903 26.765,50.237 23.112,50.237 22.175,49.3 21.025,49.3 20.375,49.95 v1(19.7,49.95)
  other v3: 19.46,13.864
TWI0_SDA: U2.AE1 U10.13 | length 52.1
  Top Layer w0.125: v1(17.269,14.385) 17.748,13.906 18.603,13.906 18.761,14.064 U2.AE1@19.059,14.064
  Top Layer w0.15: U10.13@20.192,48.296 v1@20.192,49.478
  Bottom Layer w0.125: v1(17.269,14.385) 18,15.116 18.458,15.116 20.442,17.1 20.675,17.1 20.952,17.377 20.952,17.916 21.46,18.424 21.874,18.424 23,19.55 23,22.58 23.445,23.025 24.679,23.025 26.077,24.423 26.077,45.257 27.811,46.991 27.811,48.783 26.645,49.95 23.233,49.95 22.295,49.012 20.905,49.012 20.493,49.424 20.226,49.424 v1(20.175,49.475)
UART0_CTRL: R14.2 U2.R31 U4.1 U4.4 U12.12 | length 52.4
  Top Layer w0.125: U2.R31@25.46,16.064 25.664,16.064 26.504,15.225 27.671,15.225 28.312,15.867 28.312,16.451 29.461,17.6 30.488,17.6 30.875,17.988 30.875,18.975 31.151,19.251 34.136,19.251 34.95,20.065 v1(34.95,20.964) 34.95,31.143 37.8,33.993 37.8,42.347 40.243,44.79 45.704,44.79 45.952,45.037 U4.1@47.053,45.037 ; U12.12@32.5,17.75 32.5,19.239 ; R14.2@32.61,20.964 33.737,20.964 v1(33.75,20.977) ; U4.4@47.003,43.837 47.05,43.885 47.347,43.885 47.525,44.063 47.525,44.851 47.386,44.99 47.1,44.99 U4.1@47.077,45.013
  Bottom Layer w0.125: v1(33.75,20.977) 34.937,20.977 v1(34.95,20.964)
UART0_CTS: R32.1 U2.AL9 U12.5 | length 15.8
  Top Layer w0.125: v1(20.279,11.34) 20.279,11.372 20.742,11.834 20.742,11.836 20.86,11.954 U2.AL9@20.86,12.664
  Top Layer w0.127: v1(29.05,14.375) 29.611,14.375 30.1,14.864 30.1,15.402 30.363,15.664 30.843,15.664 30.985,15.807 R32.1@30.985,16.1 U12.5@31.86,16.1
  Bottom Layer w0.125: v1(20.279,11.34) 20.775,11.836 20.775,12.167 21.233,12.625 24.625,12.625 26.375,14.375 v1(29.05,14.375)
UART0_HWFC: R13.2 U2.AK16 U4.11 U4.15 | length 58.9
  Top Layer w0.125: v2(26.375,11.6) 27.059,11.6 27.124,11.665 29.334,13.875 v1(29.9,13.875) ; R13.2@32.61,20.325 32.645,20.29 32.859,20.29 32.975,20.174 v1(32.975,19.747) 33.926,19.747 34.45,20.271 34.45,31.35 37.3,34.2 37.3,42.554 40.035,45.29 45.504,45.29 45.782,45.568 v2(46.728,45.568) ; U4.15@47.578,45.612 47.622,45.568 47.622,45.148 47.734,45.036 47.946,45.036 47.987,44.994 47.987,44.863 48.168,44.682 48.508,44.682 U4.11@48.553,44.637
  Mid-Layer 1 w0.125: v2(22.26,13.064) 22.27,13.074 22.27,13.282 22.421,13.433 23.23,13.433 23.422,13.241 23.422,13.215 23.423,12.89 23.787,12.525 25.875,12.525 26.375,12.025 v2(26.375,11.6) ; v2(46.728,45.568) 47.413,45.568 v2(47.953,45.028)
  Bottom Layer w0.125: v1(29.9,13.875) 29.9,13.879 30.25,14.229 30.25,16.038 29.675,16.613 29.675,18.8 30.126,19.251 32.479,19.251 v1(32.975,19.747)
UART0_RTS: U2.AL5 U12.4 | length 17
  Top Layer w0.125: v1(19.34,11.366) 19.797,11.823 19.797,12.23 20.059,12.492 U2.AL5@20.06,12.664 U2.AL5@20.06,12.664 ; v1(29.45,14.95) 29.45,14.98 29.788,15.318 29.788,16.113 30.175,16.5 U12.4@31.86,16.5
  Bottom Layer w0.125: v1(19.34,11.366) 19.797,11.823 19.797,12.246 20.477,12.926 24.5,12.926 26.274,14.7 27.124,14.7 28.691,14.7 28.941,14.95 v1(29.45,14.95)
UART0_RxD: U2.AL19 U12.3 | length 14.6
  Top Layer w0.125: U2.AL19@22.86,12.664 22.879,12.645 22.879,12.365 23.353,11.891 23.353,11.213 23.237,11.097 v2(23.237,11.05) ; v2(26.025,11.925) 26.984,11.925 27.124,12.065 28.578,13.519 28.578,14.851 29.513,15.785 29.513,16.226 29.513,16.312 30.1,16.9 U12.3@31.86,16.9
  Mid-Layer 1 w0.125: v2(23.237,11.05) 23.46,11.273 23.46,11.834 23.883,12.257 25.693,12.257 v2(26.025,11.925)
UART0_TxD: U2.U31 U12.2 | length 8.1
  Top Layer w0.125: U2.U31@25.46,15.664 25.664,15.664 26.429,14.9 27.775,14.9 28.587,15.712 28.587,16.337 29.55,17.3 U12.2@31.86,17.3
UART1_CTRL: R16.2 U2.AK18 U5.1 U5.4 U13.12 | length 64.9
  Top Layer w0.125: v3(22.163,10.65) 22.163,10.088 23.281,8.969 26.764,8.969 28.995,11.2 30.989,11.2 v1(31.575,10.614) 31.621,10.614 31.836,10.4 32.827,10.4 33.477,11.05 34.946,11.05 39.725,15.829 v1(39.725,23.375) 39.725,29.117 41.033,30.425 46.275,30.425 46.773,30.923 46.773,31.089 46.82,31.136 U5.4@46.947,31.136 ; v1(30.55,13.875) 30.55,14.75 30.801,15.001 32.214,15.001 32.5,14.715 U13.12@32.5,13.5 ; R16.2@32.61,22.237 33.737,22.237 v1(33.75,22.25) ; U5.4@46.985,31.136 47.033,31.184 47.33,31.184 47.475,31.329 47.475,32.182 47.369,32.289 47.083,32.289 U5.1@47.035,32.336
  Top Layer w0.127: U5.4@46.947,31.136 U5.4@46.985,31.136
  Mid-Layer 1 w0.125: v3(22.163,10.65) 22.143,10.67 22.143,10.995 22.061,11.076 22.061,12.235 22.66,12.834 v2(22.66,13.064)
  Bottom Layer w0.125: v1(30.55,13.875) 30.55,13.799 29.806,13.055 29.806,12.2 30.831,11.175 31.328,11.175 31.548,10.956 31.548,10.642 v1(31.575,10.614) ; v1(33.75,22.25) 34.075,21.925 35.328,21.925 36.547,23.145 38.871,23.145 39.103,23.377 39.723,23.377 v1(39.725,23.375)
UART1_CTS: R56.1 U2.AL15 U13.5 | length 12.8
  Top Layer w0.125: U2.AL15@22.06,12.664 22.06,12.226 22.336,11.95 22.336,11.389 23.916,9.809 26.437,9.809 28.878,12.25 v2(29.7,12.25) ; v2(30.985,11.84) 31.85,11.84 U13.5@31.86,11.85
  Mid-Layer 1 w0.125: v2(29.7,12.25) 30.575,12.25 v2(30.985,11.84)
UART1_HWFC: R15.2 U2.AK20 U5.11 U5.15 | length 56.2
  Top Layer w0.125: v3(22.54,10.25) 23.546,9.244 26.65,9.244 28.881,11.475 31.375,11.475 32.15,10.7 32.7,10.7 33.425,11.425 34.65,11.425 39.25,16.025 v1(39.25,22.81) 39.25,29.314 40.836,30.9 v2(45.475,30.9) ; R15.2@32.61,21.605 v1(33.25,21.605) ; U5.15@47.56,32.911 47.605,32.867 47.605,32.446 47.744,32.307 47.935,32.307 47.987,32.255 47.987,32.199 48.202,31.984 48.488,31.984 U5.11@48.535,31.936
  Mid-Layer 1 w0.125: v3(22.54,10.25) 22.54,11.01 22.4,11.15 22.4,12.162 23.06,12.822 v2(23.06,13.064) ; v2(45.475,30.9) 45.475,31.646 46.118,32.289 v2(47.953,32.289)
  Bottom Layer w0.125: v1(33.25,21.605) 35.481,21.605 36.697,22.821 39.238,22.821 v1(39.25,22.81)
UART1_RTS: U2.AL13 U13.4 | length 13.2
  Top Layer w0.125: U2.AL13@21.66,12.664 21.66,12.195 22.061,11.793 22.061,11.275 23.802,9.534 26.551,9.534 28.857,11.84 29.815,11.84 30.225,12.25 U13.4@31.86,12.25
UART1_RxD: U2.AL21 U13.3 | length 11.7
  Top Layer w0.125: U2.AL21@23.26,12.664 23.26,12.431 23.658,12.033 23.658,10.575 24.124,10.109 26.348,10.109 28.889,12.65 U13.3@31.86,12.65
UART1_TxD: U2.AL23 U13.2 | length 11.2
  Top Layer w0.125: U2.AL23@23.66,12.664 23.671,12.654 23.671,12.457 23.962,12.165 23.962,10.697 24.276,10.384 26.234,10.384 27.063,11.213 27.124,11.274 28.9,13.05 U13.2@31.86,13.05
VBUS: C23.2 C54.1 J4.5 R5.2 R36.2 SW4.4 TP8.1 U10.21 | length 132.1
  Top Layer w0.125: v1(6.075,51.975) R36.2@6.075,52.515 ; R5.2@28.56,9.937 28.624,10.001 28.624,10.174 28.966,10.516 29.216,10.516 v1(29.275,10.575)
  Top Layer w0.3: C23.2@15.684,45.313 15.702,45.295 16.78,45.295 17.081,45.596 U10.21@17.992,45.596
  Top Layer w0.5: C23.2@15.684,45.313 15.684,44.191 C54.1@15.775,44.1
  Top Layer w0.75: 15.775,43.525 C54.1@15.775,44.1
  Top Layer w0.8: SW4.4@5.721,60.488 5.816,60.393 7.432,60.393 8.6,59.225 v1(8.6,51.969) 8.6,46.471 11.946,43.125 v1(12.775,43.125) 15.375,43.125 15.775,43.525
  Bottom Layer w0.125: v1(6.075,51.975) 8.594,51.975 v1(8.6,51.969) ; v1(26.958,2.074) 27.593,2.709 30.808,2.709 31.328,3.23 31.328,6.597 29.275,8.65 v1(29.275,10.575)
  Bottom Layer w0.25: v1(12.775,43.125) 10.25,43.125 4.775,37.65 4.775,13.2 11.452,6.523 11.452,3.123 13.2,1.375 26.3,1.375 26.958,2.033 v1(26.958,2.074)
  Bottom Layer w0.5: v1(8.6,51.969) 15.024,51.969 16.482,53.427 16.482,58.532 17.625,59.675 21.736,59.675 TP8.1@23.372,58.039